# Altium PCB B5819W_C7420330.pcbdoc
Units mm, origin at the board's own origin, x right, y up, seen from the top; angles counter-clockwise.
Board outline 16.8 x 14.7 mm, 2 copper layers (Top Layer, Bottom Layer), stack 0 mm thick; 1 components, 0 nets, 2 pads, 0 vias.
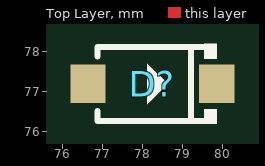
[diagram p0: Top Layer view]
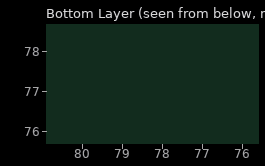
[diagram p1: Bottom Layer view, seen from below]

## Layer stack, top to bottom
Top Layer: signal copper (thickness not stored)
Bottom Layer: signal copper (thickness not stored)

## Board outline
86.65,69.85 69.85,69.85 69.85,84.555 86.65,84.555

## Design rules (kind name [scope] priority, off if disabled: settings)
PasteMaskExpansion "Paste Mask Expansion" [All] p1: expansion=0
SolderMaskExpansion "Solder Mask Expansion" [IsVia] p1: expansion=-25.4 istentingtop=TRUE
SolderMaskExpansion "Solder Mask Expansion" [All] p2: expansion=0.051 istentingtop=FALSE

## Components (designator, comment, footprint, x,y, rotation, side; value= is the part's Value field where it differs from the comment)
D? "B5819W" SOD-123_L2.7-W1.6-LS3.7-FD 78.25,77.203 r0 top

## Footprints (in the part's own frame and the unit in brackets; to place one, negate y for a bottom-side part, rotate by r counter-clockwise, add the part's x,y. Pads: shape width x height; smd on the part's side, far side on the other; paste and mask are expansions set on the pad)
SOD-123_L2.7-W1.6-LS3.7-FD [mm]
  rect 0.88x0.96 smd: 1(-1.61,0) 2(1.61,0)
  silkscreen extent -1.38,-1 1.6,1

## Nets (pads, with @x,y where several pads share a name; then routed paths per layer and width w, separated by ;. In a path a pad name is that pad's centre, name@x,y a point inside that pad or via, vN(x,y) a via of type N, cw(c..) or ccw(c..) an arc to the next point about the centre after c; other vN are vias at no path point)
pads on no net: D?.1 D?.2